# Altium PCB Spider Drone.PcbDoc
Units mm, origin at the board's own origin, x right, y up, seen from the top; angles counter-clockwise.
Board outline 72.26 x 100.96 mm, 2 copper layers (Top Layer, Bottom Layer); 59 components, 42 nets, 186 pads, 40 vias.
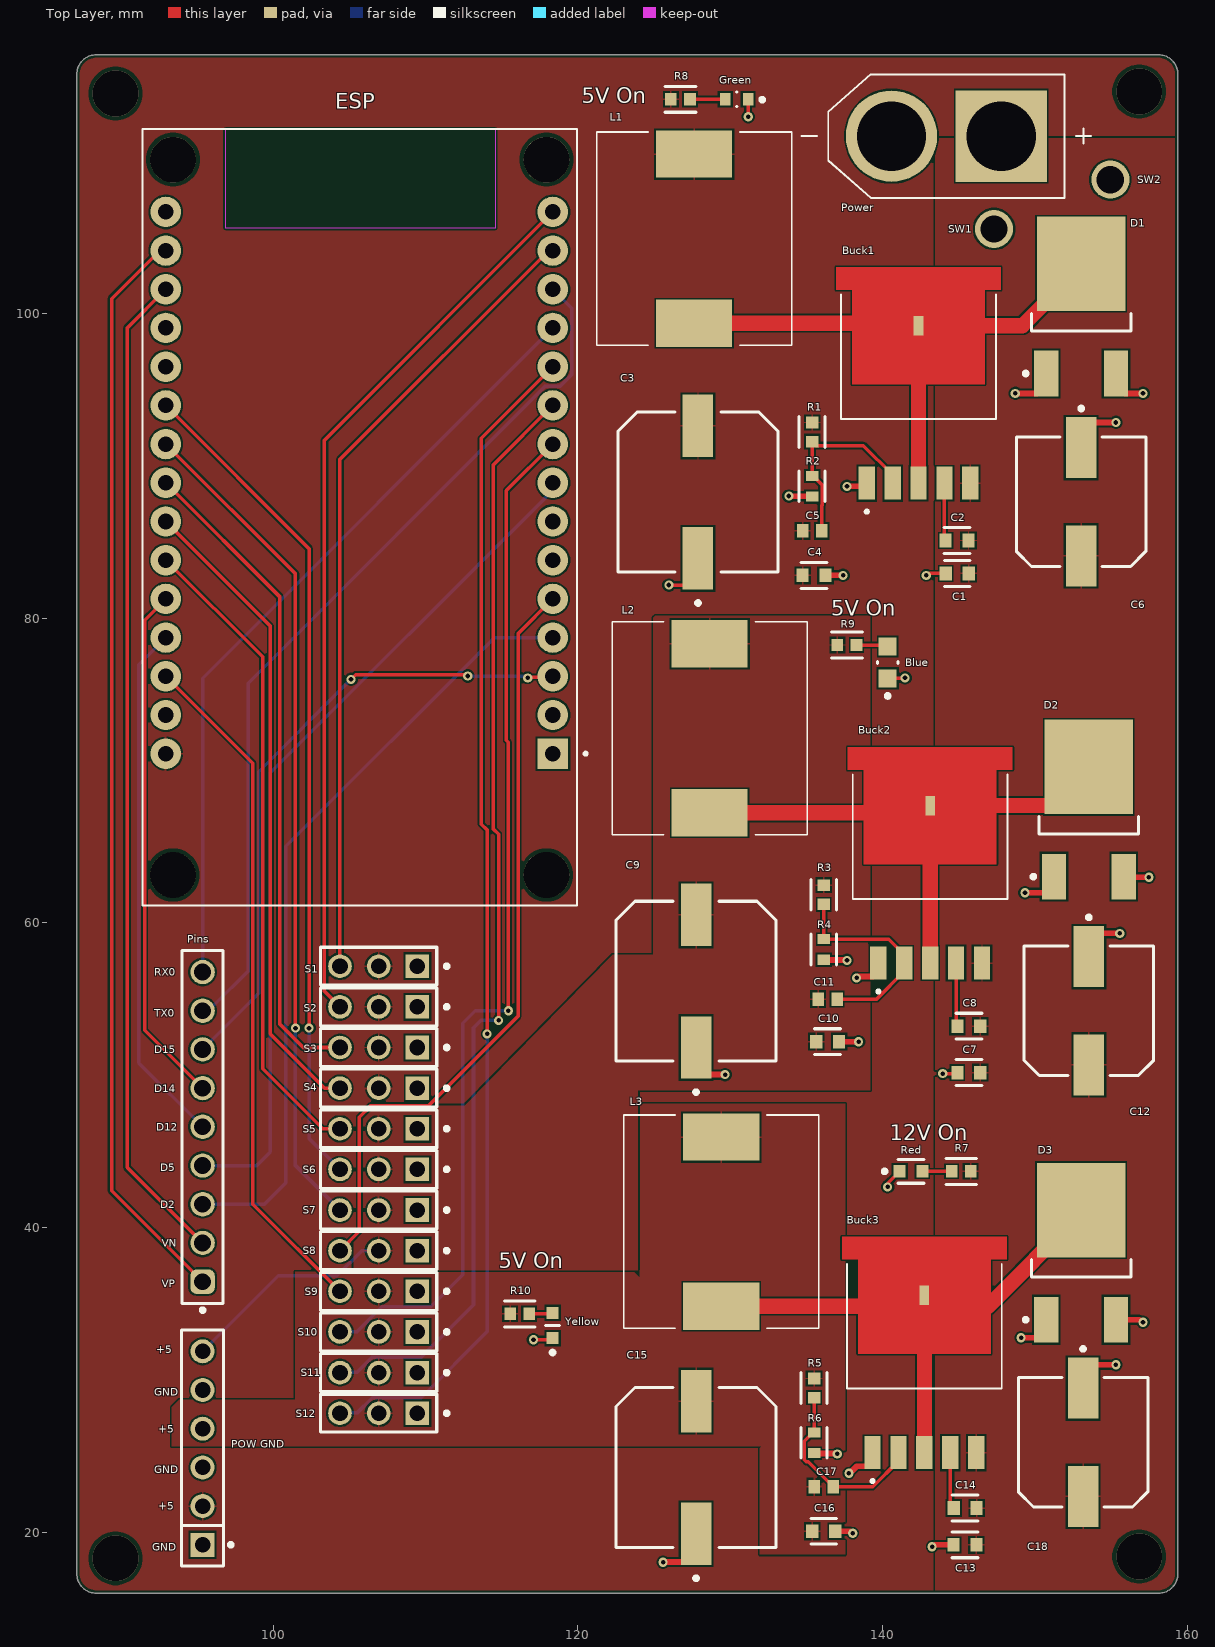
[diagram p0: Top Layer view]
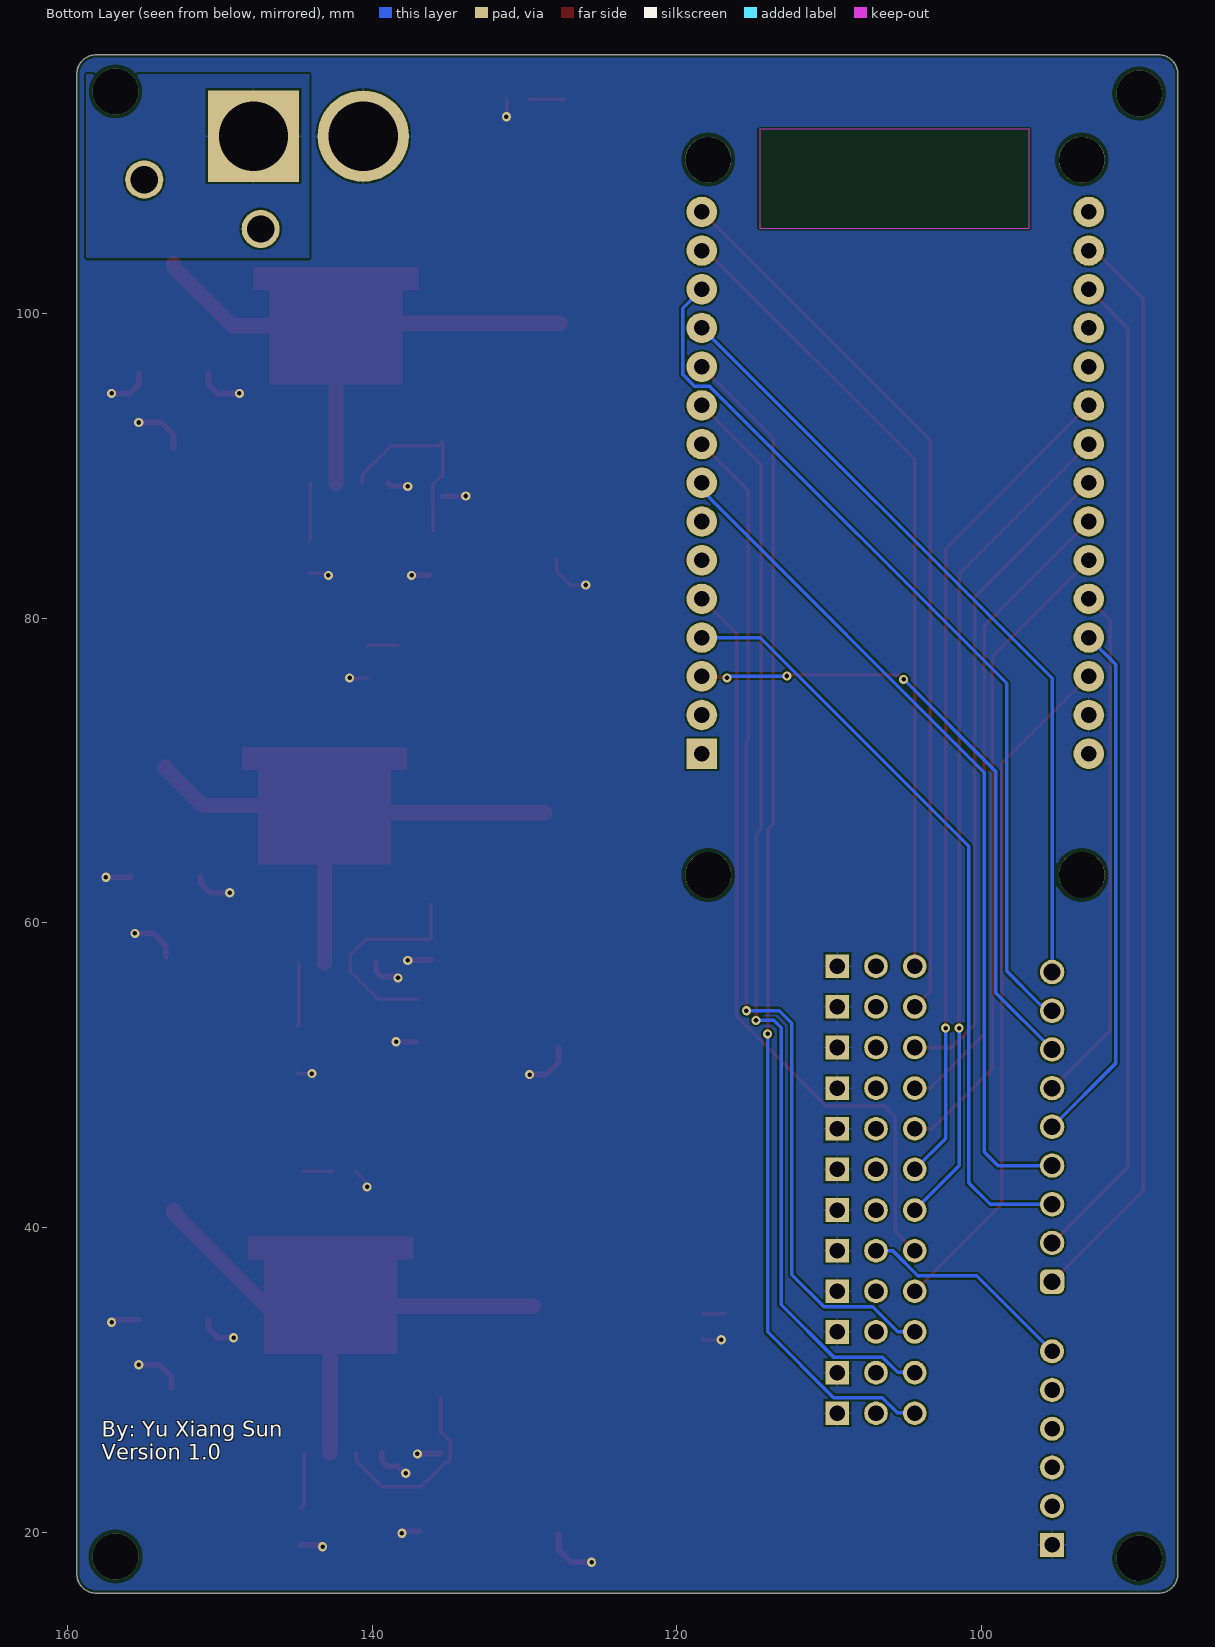
[diagram p1: Bottom Layer view, seen from below]
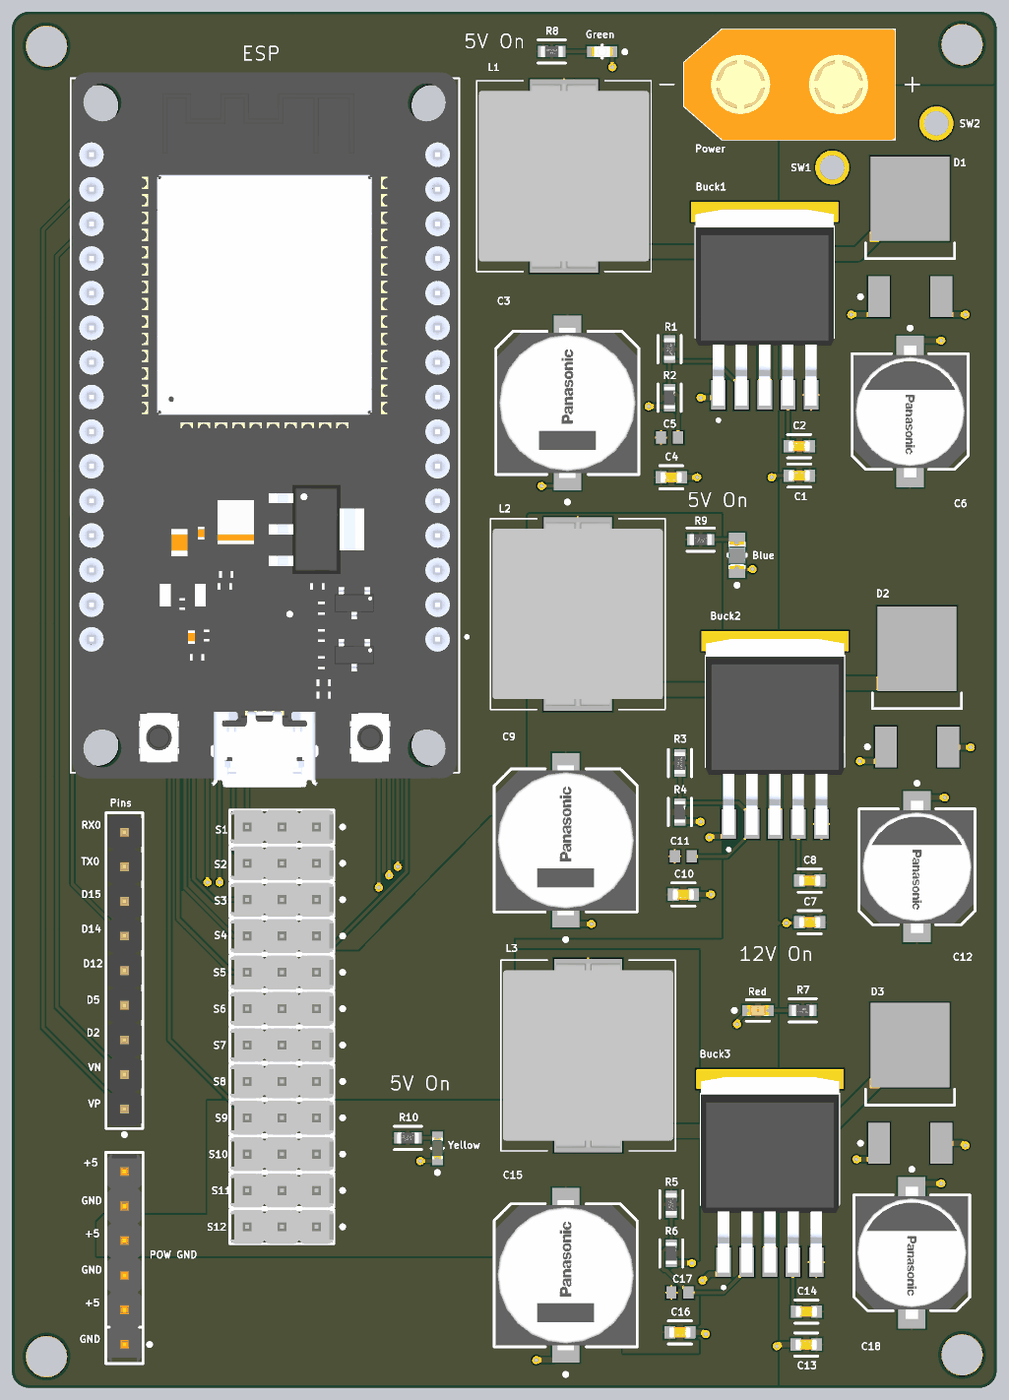
[diagram p2: 3D render of the assembled board from above, using the file's embedded part models]

## Layer stack, top to bottom
Top Solder: solder mask 0.0102, Solder Resist, Dk 3.5
Top Layer: signal copper 0.0356
Dielectric 1: dielectric 0.32, FR-4, Dk 4.8
Bottom Layer: signal copper 0.0356
Bottom Solder: solder mask 0.0102, Solder Resist, Dk 3.5

## Board outline
87.122,17.272 ccw(c88.392,17.272) 88.392,16.002 158.115,16.002 ccw(c158.115,17.272) 159.385,17.272 159.385,115.697 ccw(c158.115,115.697) 158.115,116.967 88.519,116.967 88.392,116.967 ccw(c88.392,115.697) 87.122,115.697

## Design rules (kind name [scope] priority, off if disabled: settings)
BoardOutlineClearance [All] p1: gap=0.2 ignorepadtopadclearanceinfootprint=FALSE
Clearance [All] p1: gap=0.127 ignorepadtopadclearanceinfootprint=FALSE except(0.25: Arc-Hole Track-Hole SMDPad-Hole THPad-Hole Via-Hole Fill-Hole Poly-Hole Region-Hole Text-Hole)
ComponentClearance [All] p1: gap=0.127 collisioncheckmode=3 verticalgap=0.127 showdistances=TRUE
DiffPairsRouting [All] p1: maxlimit=0.254 minlimit=0.127 mostfreqgap=0.127 toplayer_minwidth=0.127 toplayer_maxwidth=25.4 toplayer_prefwidth=0.127 bottomlayer_minwidth=0.127 bottomlayer_maxwidth=25.4 bottomlayer_prefwidth=0.127 maxuncoupledlength=12.7
Height [All] p1: minheight=0 maxheight=1816.048 prefheight=12.7
HoleSize [All] p1: absolutevalues=TRUE maxlimit=6.3 minlimit=0.3 maxpercent=80.000 minpercent=20.000
HoleToHoleClearance [All] p1: gap=0.25 allowstackedmicrovias=FALSE
MinimumAnnularRing [All] p1: minimumring=0.076
MinimumSolderMaskSliver [All] p1: minsoldermaskwidth=0
PlaneClearance [All] p1: clearance=0.127
PlaneConnect PlaneConnectPowerPads [InPadClass('PowerPads')] p1: planeconnectstyle=Direct reliefexpansion=0.508 reliefentries=4 reliefconductorwidth=0.254 reliefairgap=0.254
PlaneConnect [All] p2: pad.planeconnectstyle=Relief pad.reliefexpansion=0.3 pad.reliefentries=4 pad.reliefconductorwidth=0.127 pad.reliefairgap=0.127 via.planeconnectstyle=Direct via.reliefexpansion=0.3 via.reliefentries=4 via.reliefconductorwidth=0.127 via.reliefairgap=0.127
PolygonConnect PolygonConnectPowerPads [All vs (InPadClass('PowerPads'))] p1: connectstyle=Direct reliefconductorwidth=0.254 reliefentries=4 polygonreliefangle="90 Angle" airgapwidth=0.254
PolygonConnect [All] p2: thpad.connectstyle=Relief thpad.reliefconductorwidth=0.127 thpad.reliefentries=4 thpad.polygonreliefangle="90 Angle" thpad.airgapwidth=0.127 smdpad.connectstyle=Relief smdpad.reliefconductorwidth=0.127 smdpad.reliefentries=4 smdpad.polygonreliefangle="90 Angle" smdpad.airgapwidth=0.127 via.connectstyle=Direct via.reliefconductorwidth=0.127 via.reliefentries=4 via.polygonreliefangle="90 Angle" via.airgapwidth=0.127
RoutingVias [All] p1: holewidth=0.3 width=0.6 viastyle="Through Hole" minholewidth=0.3 minwidth=0.6 maxholewidth=0.6 maxwidth=6.6
SilkToSilkClearance [All] p1: silktosilkclearance=0
SilkToSolderMaskClearance [IsPad] p1: minsilkscreentomaskgap=0.127 clearancetoexposedcopper=TRUE
SolderMaskExpansion [All] p1: expansion=0.075 istentingtop=FALSE
SupplyNets "Schematic Supply Nets_7" [InNet('+5.2')] p1: voltage=0.000
SupplyNets "Schematic Supply Nets_6" [InNet('+5.3')] p2: voltage=0.000
SupplyNets "Schematic Supply Nets_4" [InNet('+5.1')] p3: voltage=0.000
SupplyNets "Schematic Supply Nets_3" [InNet('3V3')] p4: voltage=0.000
SupplyNets "Schematic Supply Nets_2" [InNet('+12')] p5: voltage=0.000
SupplyNets "Schematic Supply Nets_1" [InNet('GND')] p6: voltage=0.000
SupplyNets "Schematic Supply Nets" [InNet('+5')] p7: voltage=0.000
Width [All] p1: maxlimit=25.4 minlimit=0.127 preferedwidth=0.127 minimp=50.000000 maximp=50.000000 favimp=50.000000
20 further rules are at their usual default settings.

## Components (designator, comment, footprint, x,y, rotation, side; value= is the part's Value field where it differs from the comment)
Blue "LEDB" FP-APHCM2012QBC-D-F01-MFG 140.335,77.089 r90 top
Buck1 "XL4015" CONV_XL4015 142.367,99.187 r90 top
Buck2 "XL4015" CONV_XL4015 143.129,67.691 r90 top
Buck3 "XL4015" CONV_XL4015 142.748,35.56 r90 top
C1 "1uf" FP-CC0603-DA-MFG 144.907,82.931 r180 top value="1 uF"
C2 "1uf" FP-CC0603-DA-MFG 144.895,85.09 r180 top value="1 uF"
C3 "330uf" FP-EEH-G12-MFG 127.889,88.265 r90 top
C4 "1uf" FP-CC0603-DA-MFG 135.509,82.804 r0 top value="1 uF"
C5 "33nf" CAPC1608X92X38LL15T08 135.382,85.725 r180 top
C6 "220uf" FP-EEH-F-MFG 153.035,87.63 r270 top
C7 "1uf" FP-CC0603-DA-MFG 145.669,50.165 r180 top value="1 uF"
C8 "1uf" FP-CC0603-DA-MFG 145.669,53.213 r180 top value="1 uF"
C9 "330uf" FP-EEH-G12-MFG 127.762,56.166 r90 top
C10 "1uf" FP-CC0603-DA-MFG 136.398,52.197 r0 top value="1 uF"
C11 "33nf" CAPC1608X92X38LL15T08 136.398,54.991 r180 top
C12 "220uf" FP-EEH-F-MFG 153.543,54.229 r270 top
C13 "1uf" FP-CC0603-DA-MFG 145.415,19.177 r180 top value="1 uF"
C14 "1uf" FP-CC0603-DA-MFG 145.427,21.59 r180 top value="1 uF"
C15 "330uf" FP-EEH-G12-MFG 127.762,24.257 r90 top
C16 "1uf" FP-CC0603-DA-MFG 136.144,20.066 r0 top value="1 uF"
C17 "33nf" CAPC1608X92X38LL15T08 136.144,22.987 r180 top
C18 "220uf" FP-EEH-F-MFG 153.162,25.908 r270 top
D1 "Schocktty" ONSC-DPAK-3-369C-01_V 153.035,100.451 r90 top
D2 "Schocktty" ONSC-DPAK-3-369C-01_V 153.543,67.431 r90 top
D3 "Schocktty" ONSC-DPAK-3-369C-01_V 153.035,38.348 r90 top
ESP "ESP32-DEVKIT-V1" MODULE_ESP32_DEVKIT_V1 105.664,86.614 r180 top
Green "LEDG" FP-APHD1608LZGCK-MFG 130.429,114.046 r180 top
L1 "47uH 5A" PM4343473NLT 127.635,104.902 r0 top
L2 "47uH 5A" PM4343473NLT 128.651,72.771 r0 top
L3 "47uH 5A" PM4343473NLT 129.413,40.386 r0 top
Pins "9-Pins" 61300911121 95.377,46.609 r90 top
"POW GND" "6 Pins" FP-22-28-4063-MFG 95.377,25.527 r90 top
Power "XT60-M" AMASS_XT60-M 144.189,111.633 r180 top
R1 "10k" FP-CRGCQ0603-IPC_C 135.382,92.21 r90 top value=10KΩ
R2 "3.3k" FP-AC0603-IPC_C 135.382,88.646 r90 top
R3 "10k" FP-CRGCQ0603-IPC_C 136.144,61.841 r90 top value=10KΩ
R4 "3.3k" FP-AC0603-IPC_C 136.144,58.251 r90 top
R5 "10k" FP-CRGCQ0603-IPC_C 135.509,29.464 r90 top value=10KΩ
R6 "3.3k" FP-AC0603-IPC_C 135.509,25.866 r90 top
R7 "10k" FP-CRGCQ0603-IPC_C 145.161,43.688 r0 top value=10KΩ
R8 "10k" FP-CRGCQ0603-IPC_C 126.738,114.046 r180 top value=10KΩ
R9 "10k" FP-CRGCQ0603-IPC_C 137.668,78.232 r180 top value=10KΩ
R10 "10k" FP-CRGCQ0603-IPC_C 116.186,34.334 r180 top value=10KΩ
Red "LEDR" FP-LTST-C191KRKT-MFG 141.871,43.688 r0 top
S1 "3-Pin" MOLX-22-28-4033_V 106.934,57.15 r180 top
S2 "3-Pin" MOLX-22-28-4033_V 106.934,54.483 r180 top
S3 "3-Pin" MOLX-22-28-4033_V 106.934,51.816 r180 top
S4 "3-Pin" MOLX-22-28-4033_V 106.934,49.149 r180 top
S5 "3-Pin" MOLX-22-28-4033_V 106.934,46.482 r180 top
S6 "3-Pin" MOLX-22-28-4033_V 106.934,43.815 r180 top
S7 "3-Pin" MOLX-22-28-4033_V 106.934,41.148 r180 top
S8 "3-Pin" MOLX-22-28-4033_V 106.934,38.481 r180 top
S9 "3-Pin" MOLX-22-28-4033_V 106.934,35.814 r180 top
S10 "3-Pin" MOLX-22-28-4033_V 106.934,33.147 r180 top
S11 "3-Pin" MOLX-22-28-4033_V 106.934,30.48 r180 top
S12 "3-Pin" MOLX-22-28-4033_V 106.934,27.813 r180 top
SW1 "2.5mm" PCBComponent_1 147.193,105.537 r90 top
SW2 "2.5mm" PCBComponent_1 154.833,108.775 r90 top
Yellow "LEDY" FP-SML-D12-MFG 118.345,33.572 r90 top

## Footprints (in the part's own frame and the unit in brackets; to place one, negate y for a bottom-side part, rotate by r counter-clockwise, add the part's x,y. Pads: shape width x height; smd on the part's side, far side on the other; paste and mask are expansions set on the pad)
61300911121 [mm] "Pin Header, pitch 2.54 mm, THT, Vertical, single row, 9p"
  rrect50% 1.6x1.6 hole 1.1: 1(-10.16,0)
  round 1.6 hole 1.1: 2(-7.62,0) 3(-5.08,0) 4(-2.54,0) 5(0,0) 6(2.54,0) 7(5.08,0) 8(7.62,0) 9(10.16,0)
  silkscreen extent -12.15,-1.35 11.58,1.35, body extent -11.43,-1.27 11.43,1.27, height 8.57
AMASS_XT60-M [mm]
  round 6 hole 4.55: N(3.6,0)
  rect 6x6 / inner round 6 / far side rect 6x6 hole 4.55: P(-3.6,0)
  silkscreen extent -9.5,-4.05 9.5,4.05, body extent -7.75,-4.05 7.75,4.05, height 16
CAPC1608X92X38LL15T08 [mm] "Chip Capacitor, 2-Leads, Body 1.60x0.80mm, IPC High Density"
  rect 0.75x0.9 smd: 1(-0.625,0) 2(0.625,0)
  body extent -0.87,-0.48 0.87,0.48, height 0.92
CONV_XL4015 [mm]
  rect 2.16x1.07 smd: 1(-10.335,3.4) 2(-10.335,1.7) 3(-10.335,0) 4(-10.335,-1.7) 5(-10.335,-3.4)
  rect 1.27x0.635 smd paste-2 mask+0: 3.1(0,0)
  Top Layer region: 3.835,-5.4 2.365,-5.4 2.365,-4.35 -3.835,-4.35 -3.835,4.35 2.365,4.35 2.365,5.4 3.835,5.4
  silkscreen extent -12.3,-5.08 2.05,5.08, body extent -11.11,-5.08 3.24,5.08, height 4.7
FP-22-28-4063-MFG [mm]
  rect 1.57x1.57 hole 1.02 paste-2539.97 mask+0: 1(-6.35,0)
  round 1.57 hole 1.02 paste-2539.97 mask+0: 2(-3.81,0) 3(-1.27,0) 4(1.27,0) 5(3.81,0) 6(6.35,0)
  silkscreen extent -7.75,-1.97 7.75,1.37, body extent -7.85,-1.47 7.85,1.47, height 0.25
FP-AC0603-IPC_C [mm]
  rect 0.659x0.812 smd paste+0 mask+0: 1(-0.677,0) 2(0.677,0)
  silkscreen extent -1.01,-0.85 1.01,0.85, body extent -1.11,-0.55 1.11,0.55, height 0.25
FP-APHCM2012QBC-D-F01-MFG [mm]
  rect 1.2x1.2 smd paste+0 mask+0: 1(-1.05,0) 2(1.05,0)
  silkscreen extent -2.32,-0.67 0.08,0.67, body extent -1.75,-0.77 1.75,0.77, height 0.25
FP-APHD1608LZGCK-MFG [mm]
  rect 0.7x0.8 smd paste+0 mask+0: 1(-0.75,0) 2(0.75,0)
  silkscreen extent -1.8,-0.48 0.03,0.48, body extent -1.2,-0.58 1.2,0.58, height 0.25
FP-CC0603-DA-MFG [mm]
  rect 0.8x0.9 smd paste+0 mask+0: 1(-0.75,0) 2(0.75,0)
  silkscreen extent -0.85,-0.85 0.85,0.85, body extent -1.35,-0.75 1.35,0.75, height 0.25
FP-CRGCQ0603-IPC_C [mm]
  rect 0.758x0.812 smd paste+0 mask+0: 1(-0.627,0) 2(0.627,0)
  silkscreen extent -1.01,-0.85 1.01,0.85, body extent -1.11,-0.55 1.11,0.55, height 0.25
FP-EEH-F-MFG [mm]
  rect 4x2 smd paste+0 mask+0: 1(-3.55,0) 2(3.55,0)
  silkscreen extent -6.25,-4.25 4.25,4.25, body extent -5.8,-4.5 5.8,4.5, height 0.25
FP-EEH-G12-MFG [mm]
  rect 4.1x2 smd paste+0 mask+0: 1(-4.35,0) 2(4.35,0)
  silkscreen extent -7.4,-5.25 5.25,5.25, body extent -6.65,-5.5 6.65,5.5, height 0.25
FP-LTST-C191KRKT-MFG [mm]
  rect 0.8x0.8 smd paste+0 mask+0: 1(-0.75,0) 2(0.75,0)
  silkscreen extent -1.86,-0.78 0.86,0.78, body extent -1.25,-0.55 1.25,0.55, height 0.25
FP-SML-D12-MFG [mm]
  rect 0.8x0.8 smd paste+0 mask+0: 1(-0.825,0) 2(0.825,0)
  silkscreen extent -1.9,-0.45 0,0.45, body extent -1.33,-0.55 1.33,0.55, height 0.25
MODULE_ESP32_DEVKIT_V1 [mm]
  rect 2x2 / inner round 2 / far side rect 2x2 hole 1.02: 1(-12.7,15.515)
  round 2 hole 1.02: 2(-12.7,12.975) 3(-12.7,10.435) 4(-12.7,7.895) 5(-12.7,5.355) 6(-12.7,2.815) 7(-12.7,0.275) 8(-12.7,-2.265) 9(-12.7,-4.805) 10(-12.7,-7.345) 11(-12.7,-9.885) 12(-12.7,-12.425) 13(-12.7,-14.965) 14(-12.7,-17.505) 15(-12.7,-20.045) 16(12.7,-20.045) 17(12.7,-17.505) 18(12.7,-14.965) 19(12.7,-12.425) 20(12.7,-9.885) 21(12.7,-7.345) 22(12.7,-4.805) 23(12.7,-2.265) 24(12.7,0.275) 25(12.7,2.815) 26(12.7,5.355) 27(12.7,7.895) 28(12.7,10.435) 29(12.7,12.975) 30(12.7,15.515)
  round 3 hole 3 unplated: ""(-12.28,23.475) ""(-12.28,-23.475) ""(12.23,23.475) ""(12.23,-23.475)
  Keep-Out Layer region: 8.78,-25.475 -8.91,-25.475 -8.91,-18.985 8.78,-18.985
  Keep-Out Layer region: 8.78,-25.475 -8.91,-25.475 -8.91,-18.985 8.78,-18.985
  silkscreen extent -14.95,-25.48 14.23,25.48, body extent -14.1,-25.9 14.1,26.55, height 7.05
MOLX-22-28-4033_V [mm] "THD, 3-Leads, Body 7.62x2.49mm, Pitch 2.54mm"
  rect 1.55x1.55 hole 1.02: 1(-2.54,0)
  round 1.55 hole 1.02: 2(0,0) 3(2.54,0)
  silkscreen extent -4.59,-1.24 3.81,1.24, body extent -3.81,-1.24 3.81,1.24, height 8.38
ONSC-DPAK-3-369C-01_V [mm] "DPAK, 3-Leads, Body 6.54x6.095mm, Pitch 2.29mm"
  rect 3x1.6 smd: 1(-4.4,2.29) 3(-4.4,-2.29)
  rect 6.2x5.8 smd: 4(2.8,0)
  silkscreen extent -4.52,-3.27 -0.45,3.76, body extent -1.6,-3.27 4.49,3.27, height 2.38
PCBComponent_1 [mm]
  round 2.5 hole 1.8: T25(0,-0.127)
PM4343473NLT [mm]
  rect 5x3.1 smd: 1(0,-5.55) 2(0,5.55)
  silkscreen extent -6.4,-7 6.4,7, body extent -6.25,-6.75 6.25,6.75, height 5.8

## Part data
Blue: library part CMP-44529-000061-1, "LED BLUE CLEAR CHIP SMD", Case Code (Imperial)=0805, Case Code (Metric)=2012, Color=Blue, Forward Current=20mA, Forward Voltage=3.3V, Lens Color=Colorless, Max Operating Temperature=85°C, Min Operating Temperature=-40°C, Package Quantity=2000, Case/Package=0805, Dominant Wavelength=465nm, Height=0.4mm, Illumination Color=Blue, Lead Free="Lead Free", Length=2mm, Lens Style=Clear, Lens Transparency=Clear, Luminous Intensity=100mcd, Mount="Surface Mount", Number of LEDs=1, Number of Pins=2, Packaging="Tape and Reel", RoHS Compliant=Yes, Series=-, Test Current=20mA, Viewing Angle=110°, Width=1.25mm
Buck1 Buck2 Buck3: library part CMP-012-00003-3, "5A 180KHz 36V Buck DC to DC Converter", Case/Package=None, Check_prices=https://www.snapeda.com/parts/XL4015/XLSEMI/view-part/?ref=eda, Component Type=Standard, Design Item ID=XL4015, MF=XLSEMI, MP=XL4015, Pins=6, SnapEDA_Link=https://www.snapeda.com/parts/XL4015/XLSEMI/view-part/?ref=snap, Source=XL4015.SchLib
C1 C2 C4 C7 C8 C10 C13 C14 C16: library part CMP-03422-000924-1, "CAP CER 1UF 16V X7R 0603", Capacitance="1 uF", Manufacturer=YAGEO, Manufacturer Part Number=CC0603KRX7R7BB105, Package=CC0603-DA, Temperature="-55°C to +125°C", Temperature Characteristic=X7R, Temperature Coefficient=15%, Temperature Range High=+125°C, Temperature Range Low=-55°C, Tolerance=0.1, Voltage="16 V", Automotive=No, Category=Cap, ComponentLink2Description=Datasheet, ComponentLink2URL=http://www.yageo.com/documents/recent/UPY-GPHC_X7R_6.3V-to-50V_18.pdf, Device Class L1="Passive Components", Device Class L2=Capacitors, Device Class L3="Ceramic Capacitors", Digikey Description="CAP CER 1UF 16V X7R 0603", Footprint Url=http://www.yageo.com/exep/pages/download/literatures/UPY-C_GEN_24.pdf, Height=0.9mm, Lead Free=Yes, Material=Ceramic, Mouser Description="Multilayer Ceramic Capacitor, CC Series, 1 - F, - 10%, X7R, 16 V, 0603 [1608 Metric]", Octopart=https://octopart.com/cc0603krx7r7bb105-yageo-42271928, RoHS=TRUE, Voltage Rating="16 V"
C3 C9 C15: library part CMP-05428-000257-1, "Aluminum Hybrid Polymer Capacitors 330uF 20% 35V Life 4000Hours AEC-Q200 RADIAL SMT"
C5 C11 C17: library part CMP-2006-01351-1, Manufacturer=Vitramon, Part Number=VJ0603Y333JXAAC
C6 C12 C18: library part CMP-05428-000570-1, "Conductive Polymer Hybrid Aluminum Electrolytic Capacitors 220uF ±20% 25V RADIAL SMT 8x10.2mm", RoHS Compliant=Yes
D1 D2 D3: library part CMP-1055-00175-1, "SWITCHMODE(TM) Schottky Power Rectifier, 3-Pin DPAK, Pb-Free, Tape and Reel", Manufacturer="On Semiconductor", PartNumber=MBRD1045T4G, ComponentLink1Description="Manufacturer URL", ComponentLink1URL=http://www.onsemi.com/, ComponentLink2Description=Datasheet, ComponentLink2URL=http://www.onsemi.cn/pub_link/Collateral/MBRB1045-D.PDF, ComponentLink3Description="Package Specification", ComponentLink3URL=http://www.onsemi.cn/pub_link/Collateral/369C.PDF, Configuration=Single, DatasheetVersion="Rev. 8", IFSM Max (A)=70, Mounting Technology="Surface Mount", PackageDescription="3-Pin Flange Mount, Body 6.54 x 6.095 mm, Pitch 2.29 mm", PackageReference=DPAK-3-369C-01, PackageVersion="Rev. E, 02/2014", Packing="Tape and Reel", RoHS=TRUE
ESP: library part CMP-003-000000-1, "Dual core, Wi-Fi: 2.4 GHz up to 150 Mbits/s,BLE (Bluetooth Low Energy) and legacy Bluetooth, 32 bits, Up to 240 MHz", Package=None, Check_prices=https://www.snapeda.com/parts/ESP32-DEVKIT-V1/Do+it/view-part/?ref=eda, Component Type=Standard, Design Item ID=ESP32-DEVKIT-V1, MF="Do it", MP=ESP32-DEVKIT-V1, Pin Count=30, SnapEDA_Link=https://www.snapeda.com/parts/ESP32-DEVKIT-V1/Do+it/view-part/?ref=snap, Source=ESP32-DEVKIT-V1.SchLib
Green: library part CMP-44529-000045-1, "LED GREEN CLEAR 1608 SMD", Case Code (Imperial)=0603, Case Code (Metric)=1608, Color=Green, Forward Voltage=2.65V, Lens Color=Colorless, Test Current=2mA, Case/Package=0603, Dominant Wavelength=525nm, Height=0.75mm, Length=1.6mm, Lens Size=0.7mm, Lens Style=Round, Lens Transparency=Clear, Luminous Intensity=180mcd, Mount="Surface Mount", Packaging="Tape and Reel", Viewing Angle=100°, Width=0.8mm
L1 L2 L3: library part PM4343.473NLT, "Inductor", Manufacturer_Name=YAGEO, Mouser Part Number=673-PM4343.473NLT, Arrow Part Number=PM4343.473NLT, Arrow Price/Stock=https://www.arrow.com/en/products/pm4343.473nlt/pulse-electronics-corporation?region=nac, Datasheet Link=https://www.mouser.be/datasheet/2/336/P770-1663929.pdf, Height=6.5mm, Manufacturer_Part_Number=PM4343.473NLT, Mouser Price/Stock=https://www.mouser.co.uk/ProductDetail/Pulse-Electronics/PM4343.473NLT?qs=l7cgNqFNU1hovlJ%252B%252BWd9Xw%3D%3D
Pins: library part CMP-1502-01080-4, "THT Vertical Pin Header WR-PHD, Pitch 2.54 mm, Single Row, 9 pins", Color=Black, Contact Resistance=20mΩ, Current Rating=3A, Operating Supply Voltage=250V, Connector Type="Male Pin", Contact Material=Copper, Contact Mating Length=5.9944mm, Contact Plating=Gold, Gender=Male, Lead Pitch=2.54mm, Mount="Through Hole", Number of Contacts=9, Number of Pins=9, Number of Positions=9, Number of Rows=1, Orientation=Vertical, Packaging=Bulk, Pitch=2.54mm, RoHS=Compliant, Termination=Solder
"POW GND": library part CMP-04776-000885-1, "CONN HEADER VERT 6POS 2.54MM", Color=Black, Contact Resistance=20mR, Current Rating=4A, Flammability Rating="UL94 V-0", Max Operating Temperature=75°C, Max Voltage Rating (AC)=250V, Max Voltage Rating (DC)=250.25kV, Min Operating Temperature=0°C, Package Quantity=1, Connector Type="Male Pin", Contact Material=Brass, Contact Mating Length=0.24inch, Contact Plating=Gold, Contact Type="Male Pin", Depth=2.49mm, Gender=Male, Glow Wire Compliant=Non-compliant, Housing Color=Black, Housing Material=Thermoplastic, Lead Free="Lead Free", Mount="Through Hole", Number of Circuits=6, Number of Contacts=6, Number of Positions=6, Number of Rows=1, Orientation=Straight, Packaging=Bulk, Pitch=2.54mm, Radiation Hardening=No, RoHS Compliant=Yes, Series="KK® 42375", Termination=Solder, Voltage Rating=250V, Voltage Rating (DC)=250V
Power: library part CMP-00028-00007-1, "Plug; DC supply; XT60; male; PIN: 2; for cable; soldered; 30A; 500V", Case/Package=Package, Check_prices=https://www.snapeda.com/parts/XT60-M/AMASS/view-part/?ref=eda, Component Type=Standard, Design Item ID=XT60-M, MF=AMASS, MP=XT60-M, Pins=2, SnapEDA_Link=https://www.snapeda.com/parts/XT60-M/AMASS/view-part/?ref=snap, Source=XT60-M.SchLib
R1 R3 R5 R7 R8 R9 R10: library part CMP-03211-009884-1, "CRGCQ 0603 10K 5%", Ambient Temperature Range High=+70°C, Manufacturer="TE Connectivity", Manufacturer Part Number=CRGCQ0603J10K, Package=CRGCQ0603, Power Rating=0.1W, Resistance=10KΩ, Temperature="-55°C to +155°C", Temperature Coefficient=±100ppm/°C, Temperature Range High=+155°C, Temperature Range Low=-55°C, Tolerance=0.05, Voltage Rating=75V, Category=Res, ComponentLink2Description=Datasheet, ComponentLink2URL=https://www.te.com/commerce/DocumentDelivery/DDEController?Action=showdoc&DocId=Data+Sheet%7F1773204-3%7F1%7Fpdf%7FEnglish%7FENG_DS_1773204-3_1.pdf%7F4-2176339-923, Composition="Thick Film", Device Class L1="Passive Components", Device Class L2=Resistors, Device Class L3="Chip SMD Resistors", Digikey Description="CRGCQ 0603 10K 5%", Height=0.55mm, Ipc Land Pattern Name=RESC16080X45, Lead Free=Yes, Mouser Description="Res Thick Film 0603 10K Ohm 5% 0.1W(1/10W) ±100ppm/C Pad SMD Automotive T/R", Octopart=https://octopart.com/crgcq0603j10k-te+connectivity-91018097, RoHS=TRUE, Series=CRGCQ
R2 R4 R6: library part CMP-03412-041670-1, "RES 3.3kΩ 1.00% 0.2W 0603", RoHS Compliant=Yes
Red: library part CMP-2000-05199-2, Case Code (Imperial)=0603, Case Code (Metric)=1608, Color=Red, Current=2A, Forward Current=20mA, Forward Voltage=2V, Lens Color=Colorless, Max Operating Temperature=85°C, Min Operating Temperature=-55°C, Power Dissipation=75mW, Reverse Voltage=5V, Case/Package=0603, Depth=800µm, Dominant Wavelength=631nm, Height=550µm, Illumination Color=Red, Lead Free="Lead Free", Length=1.6mm, Lens Style=Clear, Lens Transparency=Clear, Luminous Intensity=54mcd, Mount="Surface Mount", NexarPartId=549908, Number of Elements=1, Number of LEDs=1, Number of Pins=2, Packaging="Tape and Reel", Power Rating=75mW, Radiation Hardening=No, RoHS=Compliant, Schedule B="8541402000, 8541402000", Test Current=20mA, Viewing Angle=130°, Voltage=2V, Wavelength=639nm, Width=800µm
S1 S2 S3 S4 S5 S6 S7 S8 S9 S10 S11 S12: library part CMP-1676-00001-5, "Male Header, Pitch 2.54 mm, 1 x 3 Position, Height 8.38 mm, Tail Length 3.18 mm, RoHS, Bulk", Colour=Black, Current Rating="4 A", Manufacturer=Molex, Max Operating Temperature="75 degC", Min Operating Temperature="0 degC", Package Quantity=1, Voltage Rating="250 V", ComponentLink1Description="Manufacturer URL", ComponentLink1URL=http://www.molex.com/, ComponentLink2Description=Datasheet, ComponentLink2URL=http://www.molex.com/pdm_docs/sd/022284033_sd.pdf, Contact Finish=Gold, Contact Material=Brass, Contact Plating=Gold, DatasheetVersion="Rev. G, 01/2012", Height="8.38 mm", Lead Pitch="0.1 inch", Length="7.62 mm", Mount="Through Hole", Mounting Technology="Through Hole", PackageDescription="Male Header, Pitch 2.54 mm, 1 x 3 Position, Height 8.38 mm, Tail Length 3.18 mm", PackageReference=22-28-4033, Packaging=Bulk, Pins=3, REACH SVHC=Unknown, RoHSCompliant=true, Rows=1
SW1 SW2: library part SolderPoint25
Yellow: library part CMP-08952-000023-1, "LED YELLOW DIFFUSED 0603 SMD", Colour=Yellow, Forward Current=20mA, Forward Voltage=2.2V, Manufacturer=Rohm, Manufacturer Part Number=SML-D12Y8WT86, Package=SML-D12, Power Dissipation=54mW, Reverse Voltage=5V, Temperature="-40°C to +85°C", Temperature Range High=+85°C, Temperature Range Low=-40°C, Automotive=No, Category=Diode, ComponentLink2Description=Datasheet, ComponentLink2URL=https://d1d2qsbl8m0m72.cloudfront.net/en/products/databook/datasheet/opto/led/chip_mono/sml-d12x8_d13x8-e.pdf, Device Class L1=Optoelectronics, Device Class L2=LEDs, Device Class L3=unset, Digikey Description="LED YELLOW DIFFUSED 0603 SMD", Height=0.65mm, Lead Free=Yes, Led Orientation="Top View", Luminous Intensity=63mcd, Mouser Description="Standard LEDs - SMD SMD Yellow 25-160 mcd", Octopart=https://octopart.com/sml-d12y8wt86-rohm-8992279, RoHS=TRUE, Wavelength=590nm

## Via types
v1: diameter 0.6, hole 0.3, Top Layer to Bottom Layer, 36 vias
v2: diameter 3, hole 3, Top Layer to Bottom Layer, 4 vias

## Nets (pads, with @x,y where several pads share a name; then routed paths per layer and width w, separated by ;. In a path a pad name is that pad's centre, name@x,y a point inside that pad or via, vN(x,y) a via of type N, cw(c..) or ccw(c..) an arc to the next point about the centre after c; other vN are vias at no path point)
3V3: ESP.1
+5: "POW GND.2" C3.2 C4.1 C5.2 ESP.30 L1.2 R1.2 R8.2 S1.2 S2.2 S3.2 S4.2
+5.1: "POW GND.4"
+5.2: "POW GND.6" C9.2 C10.1 C11.2 L2.2 R3.2 R9.2 S5.2 S6.2 S7.2 S8.2 | length 14.3
  Bottom Layer w0.23: 95.377,31.877 100.331,36.831 104.182,36.831 105.814,38.463 106.916,38.463 S8.2
+5.3: C15.2 C16.1 C17.2 L3.2 R5.2 R10.2 S9.2 S10.2 S11.2 S12.2
+12: Buck1.5 Buck2.5 Buck3.5 C1.1 C2.1 C6.2 C7.1 C8.1 C12.2 C13.1 C14.1 C18.2 R7.2
D2: ESP.4 Pins.3 | length 51.3
  Bottom Layer w0.23: Pins.3 99.441,41.529 100.838,42.926 100.838,65.024 114.533,78.719 ESP.4
D5: ESP.8 Pins.4 | length 56.4
  Bottom Layer w0.23: Pins.4 98.933,44.069 99.822,44.958 99.822,69.85 117.886,87.914 117.886,87.922 118.364,88.4 ESP.8
D12: ESP.27 Pins.5 | length 34.6
  Bottom Layer w0.23: ESP.27 91.186,76.941 91.186,50.8 Pins.5
D14: ESP.26 Pins.6 | length 34.3
  Top Layer w0.23: ESP.26 91.569,79.864 91.569,52.957 Pins.6
D15: ESP.3 Pins.7 | length 41.8
  Top Layer w0.23: v1(105.119,75.977) 105.148,75.977 105.439,76.269 112.707,76.269 v1(112.778,76.198) ; v1(116.713,76.073) 116.766,76.126 118.311,76.126 ESP.3
  Bottom Layer w0.23: Pins.7 99.06,55.372 99.06,69.918 v1(105.119,75.977) ; v1(112.778,76.198) 116.488,76.198 116.613,76.073 v1(116.713,76.073)
GND: "POW GND.1" "POW GND.3" "POW GND.5" Blue.1 Buck1.1 Buck2.1 Buck3.1 C1.2 C3.1 C4.2 C6.1 C7.2 C9.1 C10.2 C12.1 C13.2 C15.1 C16.2 C18.1 D1.1 D1.3 D2.1 D2.3 D3.1 D3.3 ESP.2 ESP.29 Green.1 Power.N R2.1 R4.1 R6.1 Red.1 S1.1 S2.1 S3.1 S4.1 S5.1 S6.1 S7.1 S8.1 S9.1 S10.1 S11.1 S12.1 Yellow.1 | length 56.9
  Top Layer w0.23: v1(117.094,32.639) 118.237,32.639 Yellow.1 ; v1(125.984,82.169) 127.004,82.169 127.889,83.054 C3.1 ; v1@131.179,112.915 Green.1 ; v1(140.335,42.672) 140.335,42.902 Red.1 ; Blue.1 141.444,76.039 v1(141.478,76.073) ; v1(142.875,82.804) 142.975,82.804 143.102,82.931 C1.2 ; v1(143.954,50.102) 144.855,50.102 C7.2
  Top Layer w0.381: v1(125.603,18.034) 125.617,18.048 126.952,18.048 127.762,18.857 C15.1 ; C9.1 127.762,50.848 128.572,50.038 v1(129.667,50.038) ; v1(133.858,88.011) 133.879,87.99 135.361,87.99 R2.1 ; R6.1 135.531,25.168 137.011,25.168 v1(137.033,25.146) ; R4.1 136.166,57.553 137.646,57.553 v1(137.668,57.531) ; C4.2 v1(137.414,82.804) ; C16.2 137.863,20.066 137.99,19.939 v1(138.049,19.939) ; C10.2 v1(138.43,52.197) ; v1(137.668,88.646) 138.761,88.646 Buck1.1 ; v1(137.795,23.876) 137.854,23.876 138.314,24.335 139.003,24.335 139.348,24.68 Buck3.1 ; v1(138.303,56.388) 138.362,56.388 138.441,56.466 139.384,56.466 139.729,56.811 Buck2.1 ; v1(143.256,19.05) 143.315,19.05 143.442,19.177 C13.2 ; v1(148.717,94.742) 150.135,94.742 150.745,95.352 D1.1 ; v1(149.098,32.766) 150.135,32.766 150.745,33.376 D3.1 ; v1(149.352,61.976) 150.643,61.976 151.253,62.586 D2.1 ; C6.1 153.035,92.027 153.845,92.837 v1(155.321,92.837) ; C18.1 153.162,30.184 153.972,30.994 v1(155.321,30.994) ; C12.1 153.543,58.499 154.353,59.309 v1(155.575,59.309) ; D3.3 156.874,33.948 157.04,33.782 v1(157.099,33.782) ; D1.3 155.325,95.352 155.935,94.742 v1(157.099,94.742) ; D2.3 155.872,62.992 v1(157.48,62.992)
  other v1: 131.191,112.903
NetBlue_2: Blue.2 R9.1 | length 2.1
  Top Layer w0.23: R9.1 140.242,78.232 Blue.2
NetBuck1_2: Buck1.2 C5.1 R1.1 R2.2 | length 12.9
  Top Layer w0.23: C5.1 136.007,87.394 136.03,87.417 136.03,88.751 135.459,89.323 R2.2 R1.1 135.646,91.319 138.745,91.319 140.667,89.397 Buck1.2
NetBuck1_3: Buck1.3 Buck1.3.1 D1.4 L1.1 | length 37.1
  Top Layer w1: L1.1 142.154,99.352 Buck1.3.1@142.184,99.322 ; Buck1.3 142.367,98.806 142.748,99.187 149.171,99.187 153.035,103.051 D1.4
NetBuck1_4: Buck1.4 C2.2 | length 3.8
  Top Layer w0.23: Buck1.4 144.067,85.168 C2.2
NetBuck2_2: Buck2.2 C11.1 R3.1 R4.2 | length 14.2
  Top Layer w0.23: R3.1 R4.2 140.402,58.928 141.429,57.901 Buck2.2 141.429,56.811 139.609,54.991 C11.1
NetBuck2_3: Buck2.3 Buck2.3.1 D2.4 L2.1 | length 36.6
  Top Layer w1: L2.1 142.611,67.221 143.081,67.691 Buck2.3.1 ; Buck2.3 143.129,67.221 Buck2.3.1 ; D2.4 153.543,70.091 151.143,67.691 Buck2.3.1
NetBuck2_4: Buck2.4 C8.2 | length 4.2
  Top Layer w0.23: Buck2.4 144.829,53.303 C8.2
NetBuck3_2: Buck3.2 C17.1 R5.1 R6.2 | length 12.6
  Top Layer w0.23: R5.1 R6.2 135.432,26.543 134.861,25.972 134.861,24.76 135.003,24.618 135.138,24.618 136.434,23.322 136.509,23.322 136.769,23.062 C17.1 139.355,22.987 141.048,24.68 Buck3.2
NetBuck3_3: Buck3.3 Buck3.3.1 D3.4 L3.1 | length 37.2
  Top Layer w1: L3.1 142.024,34.836 Buck3.3.1 142.748,35.179 143.129,34.798 ; Buck3.3 142.748,34.836 142.786,34.798 143.129,34.798 ; D3.4 153.035,40.948 146.885,34.798 143.129,34.798
NetBuck3_4: Buck3.4 C14.2 | length 3.7
  Top Layer w0.23: Buck3.4 144.448,21.819 C14.2
NetGreen_2: Green.2 R8.1 | length 2.3
  Top Layer w0.23: R8.1 Green.2
NetR7_1: R7.1 Red.2 | length 1.9
  Top Layer w0.23: Red.2 R7.1
NetR10_1: R10.1 Yellow.2 | length 1.6
  Top Layer w0.23: R10.1 118.282,34.334 Yellow.2
Power: Power.P
RX0: ESP.12 Pins.9 | length 51.8
  Bottom Layer w0.23: Pins.9 95.377,76.052 ESP.12
S1: ESP.14 S1.3 | length 52.9
  Top Layer w0.23: S1.3 104.394,90.424 118.089,104.119 ESP.14
S2: ESP.15 S2.3 | length 58.8
  Top Layer w0.23: S2.3 103.377,55.5 103.377,91.672 ESP.15
S3: ESP.23 S3.3 | length 43.2
  Top Layer w0.23: ESP.23 100.457,81.386 100.457,53.34 101.981,51.816 S3.3
S4: ESP.24 S4.3 | length 42.5
  Top Layer w0.23: ESP.24 99.822,79.481 99.822,52.705 103.378,49.149 S4.3
S5: ESP.25 S5.3 | length 42.7
  Top Layer w0.23: ESP.25 99.314,77.449 99.314,50.419 103.251,46.482 S5.3
S6: ESP.21 S6.3 | length 54.9
  Top Layer w0.23: ESP.21 102.362,84.561 v1(102.362,53.086)
  Bottom Layer w0.23: v1(102.362,53.086) 102.362,45.847 S6.3
S7: ESP.22 S7.3 | length 55
  Top Layer w0.23: ESP.22 101.473,82.91 101.473,53.091 v1(101.475,53.088)
  Bottom Layer w0.23: v1(101.475,53.088) 101.473,53.086 101.473,44.069 S7.3
S8: ESP.5 S8.3 | length 50.8
  Top Layer w0.23: S8.3 105.664,39.751 105.664,47.244 106.426,48.006 110.223,48.006 116.078,53.861 116.078,78.973 ESP.5
S9: ESP.28 S9.3 | length 45.1
  Top Layer w0.23: ESP.28 98.679,70.464 98.679,41.529 S9.3
S10: ESP.9 S10.3 | length 68
  Top Layer w0.23: v1(115.443,54.229) 115.443,71.858 115.316,71.985 115.316,88.371 ESP.9
  Bottom Layer w0.23: S10.3 104.412,33.165 105.514,33.165 107.146,34.797 110.349,34.797 112.458,36.906 112.458,53.408 113.279,54.229 v1(115.443,54.229)
S11: ESP.10 S11.3 | length 72.7
  Top Layer w0.23: v1(114.808,53.594) 114.808,65.804 114.469,66.143 114.469,90.064 ESP.10
  Bottom Layer w0.23: S11.3 104.412,30.498 105.514,30.498 106.518,31.502 109.721,31.502 113.157,34.938 113.157,53.101 113.65,53.594 v1(114.808,53.594)
S12: ESP.11 S12.3 | length 77.3
  Top Layer w0.23: v1(114.046,52.705) 114.046,66.099 113.665,66.48 113.665,91.8 ESP.11
  Bottom Layer w0.23: S12.3 104.412,27.831 105.514,27.831 106.518,28.835 109.721,28.835 114.046,33.16 v1(114.046,52.705)
TX0: ESP.13 Pins.8 | length 58.7
  Bottom Layer w0.23: Pins.8 95.748,54.229 96.137,54.618 96.147,54.618 98.363,56.834 98.363,75.715 117.878,95.229 118.85,95.229 119.606,95.985 119.606,100.337 ESP.13
VN: ESP.18 Pins.2 | length 65.7
  Top Layer w0.23: ESP.18 90.424,99.039 90.424,43.942 Pins.2
VP: ESP.17 Pins.1 | length 71.9
  Top Layer w0.23: ESP.17 92.562,104.119 89.408,100.965 89.408,42.418 Pins.1
pads on no net: ESP. ESP.6 ESP.7 ESP.16 ESP.19 ESP.20 SW1.T25 SW2.T25
copper on no net:
  other v2: 89.662,18.288 156.845,18.415 89.662,114.427 156.845,114.554

## Polygon pours and split planes (outlines as drawn)
+5.3 on Top Layer "NONET_L-01_P-001" (solid, remove dead copper, pour order 4): 132.08,25.654 131.953,25.527 131.953,18.542 137.541,18.542 137.541,48.133 124.206,48.133 124.079,48.006 124.079,36.703 123.698,37.084 101.473,37.084 101.473,28.702 93.853,28.702 93.345,28.194 93.345,25.654
+5.2 on Top Layer "NONET_L-01_P-001" (solid, remove dead copper, pour order 1): 125.095,80.137 124.968,80.01 124.968,57.912 122.301,57.912 112.585,48.006 105.283,48.006 105.283,37.211 123.952,37.211 123.952,49.022 139.192,49.022 139.192,80.137
+12 on Top Layer "+12_L01_P000" (solid, pour order 0): 143.454,111.506 160.655,111.506 160.655,12.319 159.766,11.43 143.454,11.43
+5 on Top Layer "+5_L01_P005" (solid, pour order 5): 83.807,121.552 160.134,121.552 160.134,11.189 159.753,10.808 84.065,10.808
Power on Bottom Layer "POWER_L02_P002" (solid, remove dead copper, pour order 2): 144.145,115.697 158.75,115.697 158.75,103.632 144.145,103.632
GND on Bottom Layer "GND_L02_P003" (solid, pour order 3): 83.242,122.174 158.877,122.174 160.655,120.396 160.655,10.541 85.725,10.541 83.629,12.637

## Silkscreen, mask and mechanical layers (free items; w line width, h text height)
Top Overlay:
  text "5V On" at 120.269,113.792 h1
  text "5V On" at 136.652,80.137 h1
  text "RX0" at 92.202,56.515 h0.5
  text "TX0" at 92.202,53.848 h0.5
  text "D15" at 92.202,51.435 h0.5
  text "D14" at 92.202,48.895 h0.5
  text "D12" at 92.329,46.355 h0.5
  text "12V On" at 140.462,45.72 h1
  text "D5" at 92.583,43.688 h0.5
  text "D2" at 92.583,41.275 h0.5
  text "VN" at 92.71,38.735 h0.5
  text "5V On" at 114.808,37.338 h1
  text "VP" at 92.71,36.068 h0.5
  text "+5" at 92.329,31.75 h0.5
  text "GND" at 92.202,28.956 h0.5
  text "+5" at 92.456,26.543 h0.5
  text "GND" at 92.202,23.876 h0.5
  text "+5" at 92.456,21.463 h0.5
  text "GND" at 92.075,18.796 h0.5
Bottom Overlay:
  text "By: Yu Xiang Sun / Version 1.0" at 157.734,24.765 h1
Mechanical 1:
  lines w0.254: 88.392,116.967 ccw(c88.392,115.697) 87.122,115.697 87.122,17.272 ccw(c88.392,17.272) 88.392,16.002 158.115,16.002 ccw(c158.115,17.272) 159.385,17.272 159.385,115.697 ccw(c158.115,115.697) 158.115,116.967 88.519,116.967
Top Designator:
  lines w0.254: 89.154,19.812 89.662,18.288 ; 89.154,112.903 89.662,114.427 ; 89.408,18.288 89.916,18.288 ; 89.408,114.427 89.916,114.427 ; 89.662,18.034 89.662,18.542 ; 89.662,58.461 89.662,18.288 ; 89.662,74.254 89.662,114.427 ; 89.662,114.173 89.662,114.681 ; 90.17,19.812 89.662,18.288 ; 90.17,112.903 89.662,114.427 ; 91.185,18.799 89.662,18.288 ; 91.185,114.938 89.662,114.427 ; 91.187,17.783 89.662,18.288 ; 91.187,113.922 89.662,114.427 ; 115.357,18.337 89.662,18.288 ; 115.357,114.476 89.662,114.427 ; 131.15,18.366 156.845,18.415 ; 131.15,114.505 156.845,114.554 ; 155.32,18.92 156.845,18.415 ; 155.32,115.059 156.845,114.554 ; 155.322,17.904 156.845,18.415 ; 155.322,114.043 156.845,114.554 ; 156.337,19.939 156.845,18.415 ; 156.337,113.03 156.845,114.554 ; 156.591,18.415 157.099,18.415 ; 156.591,114.554 157.099,114.554 ; 156.845,18.161 156.845,18.669 ; 156.845,58.588 156.845,18.415 ; 156.845,74.381 156.845,114.554 ; 156.845,114.3 156.845,114.808 ; 157.353,19.939 156.845,18.415 ; 157.353,113.03 156.845,114.554
  text "67.183 (mm)" at 115.612,113.562 h1.52 r0.11
  text "96.139 (mm)" at 157.759,58.842 h1.52 r90
  text "96.139 (mm)" at 90.576,58.715 h1.52 r90
  text "67.183 (mm)" at 115.612,17.423 h1.52 r0.11